# Altium PCB PCB2_OBC_ADCS_asistida.PcbDoc (part 1 of 2)
Units mm, origin at the board's own origin, x right, y up, seen from the top; angles counter-clockwise.
Board outline 90.17 x 95.9 mm, 4 copper layers (Top Layer, GND, PWR, Bottom Layer), stack 1.59 mm thick; 52 components, 110 nets, 475 pads, 111 vias.
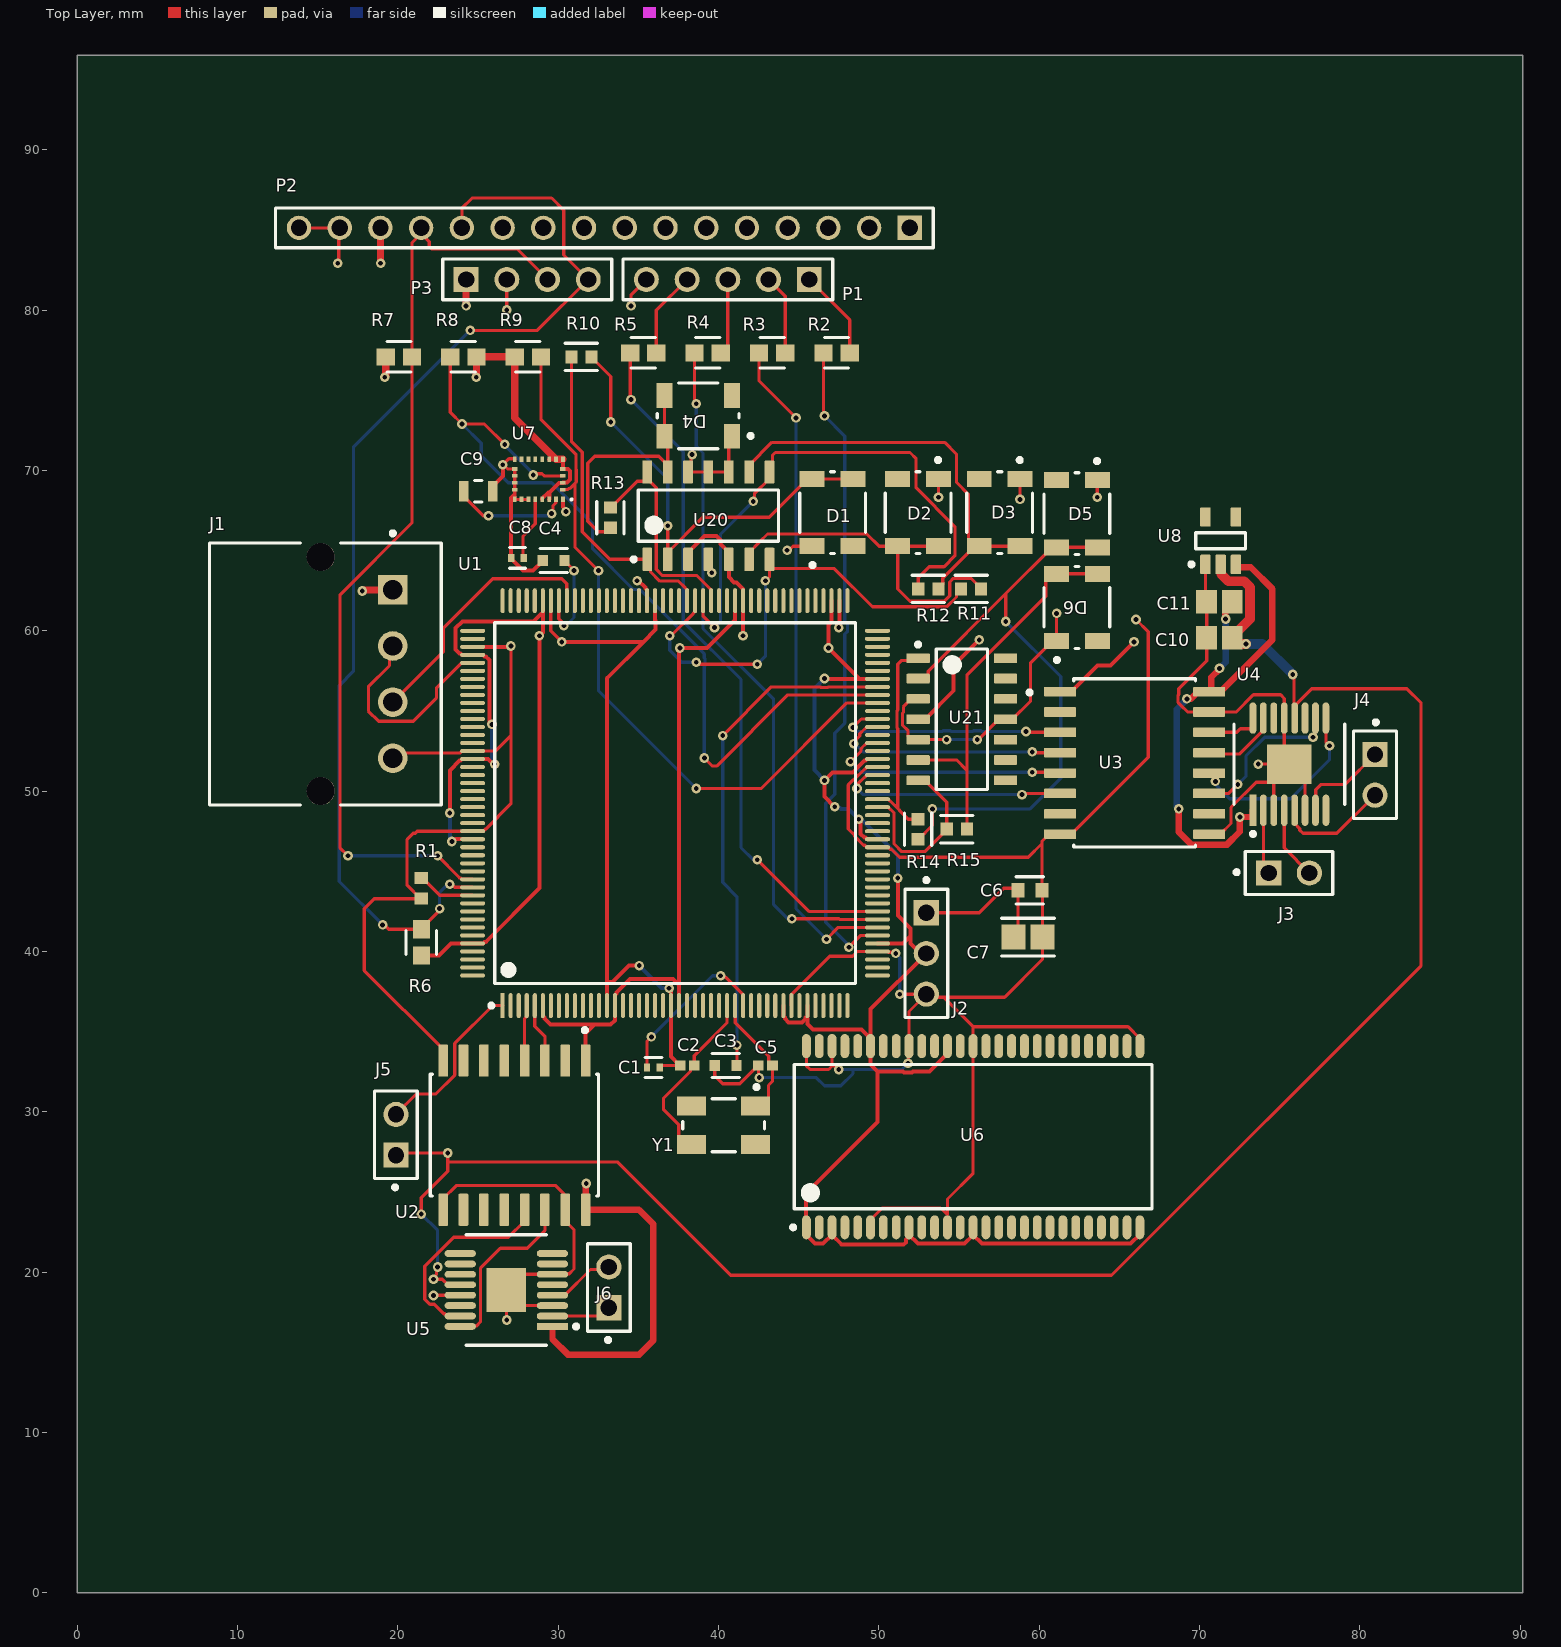
[diagram p0: Top Layer view]
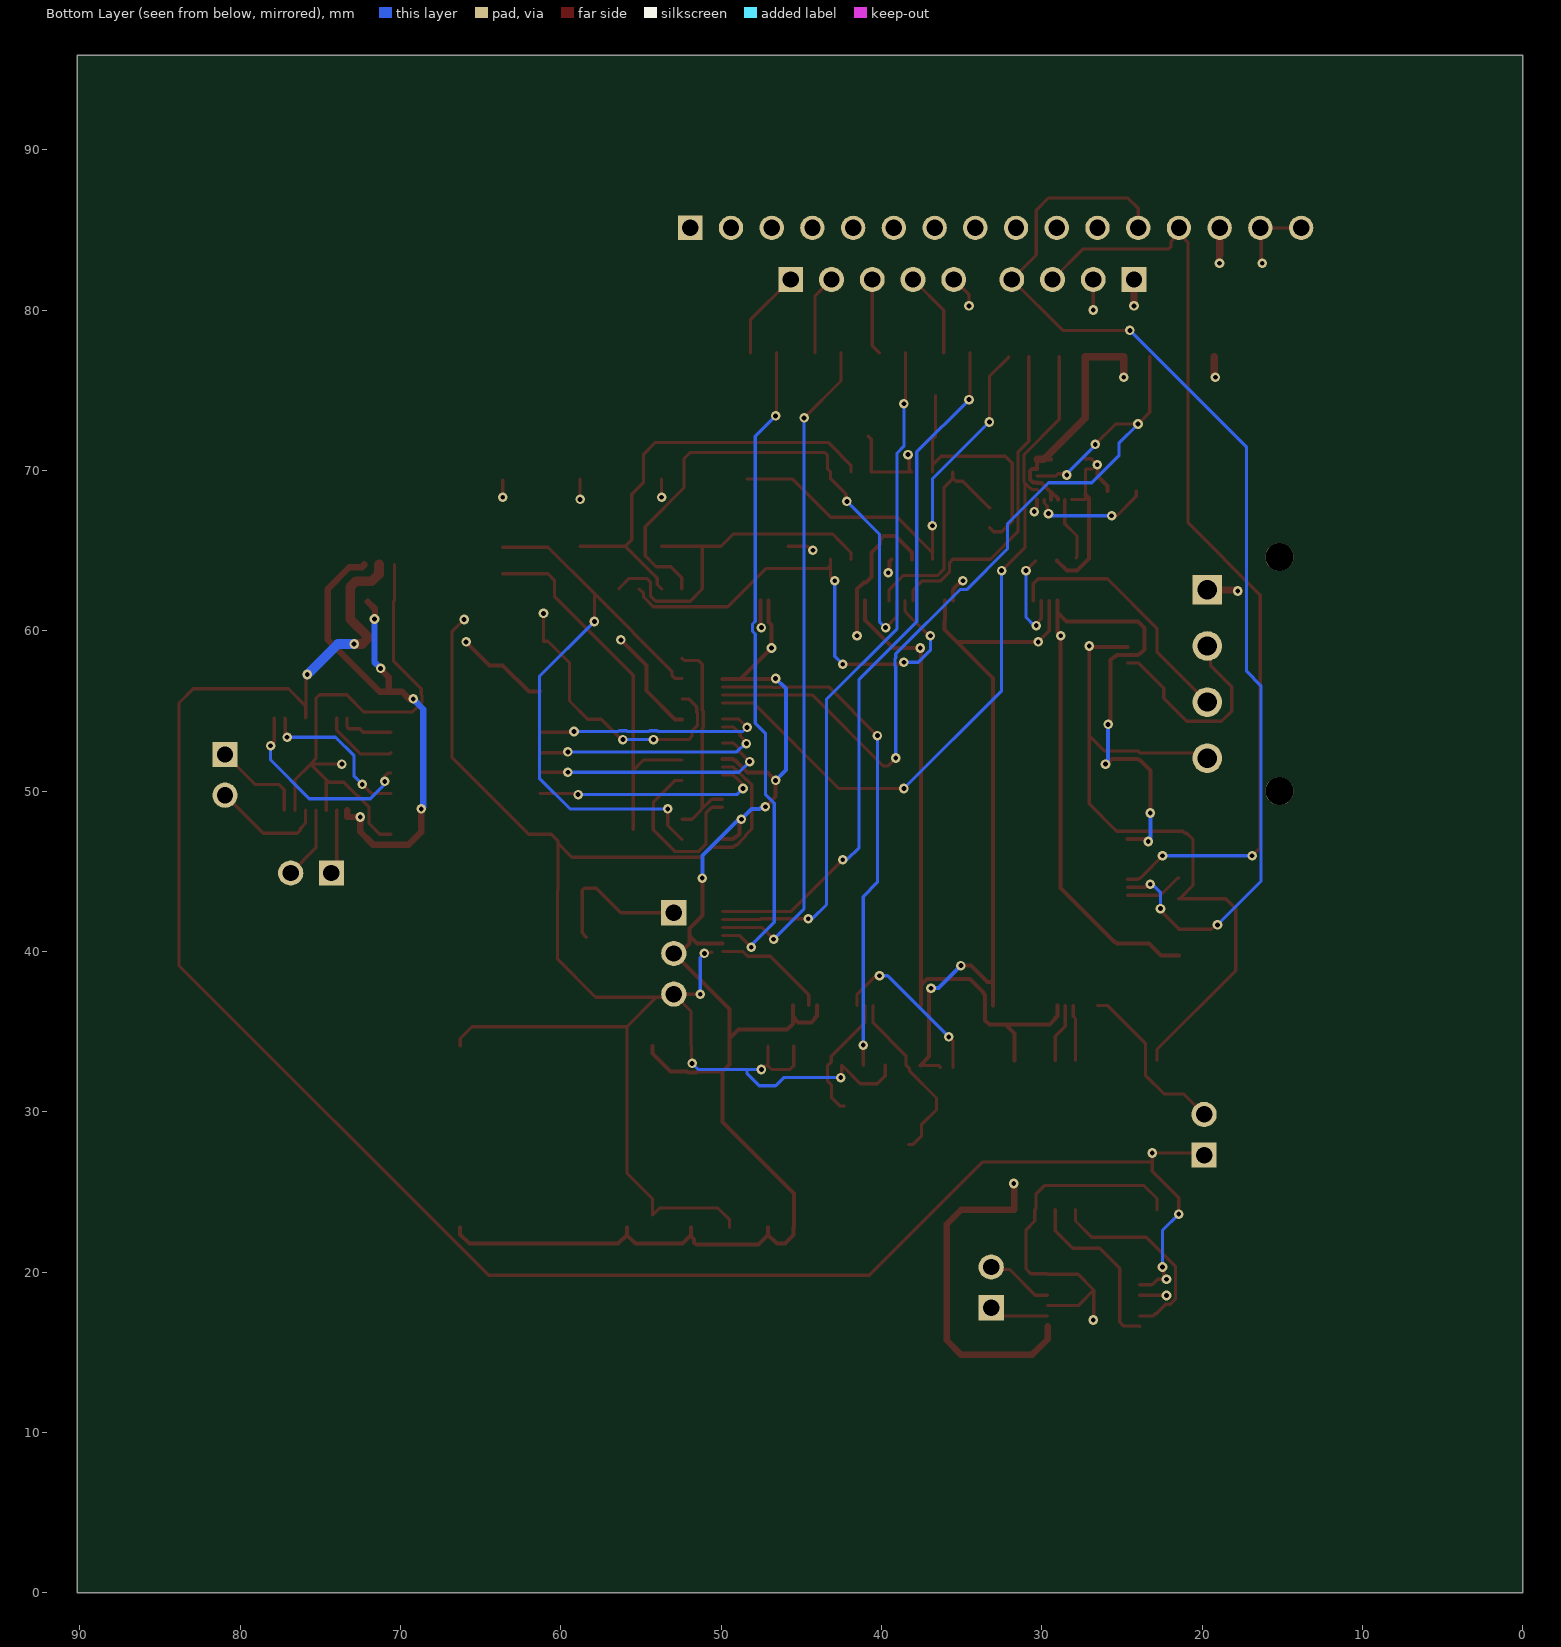
[diagram p1: Bottom Layer view, seen from below]
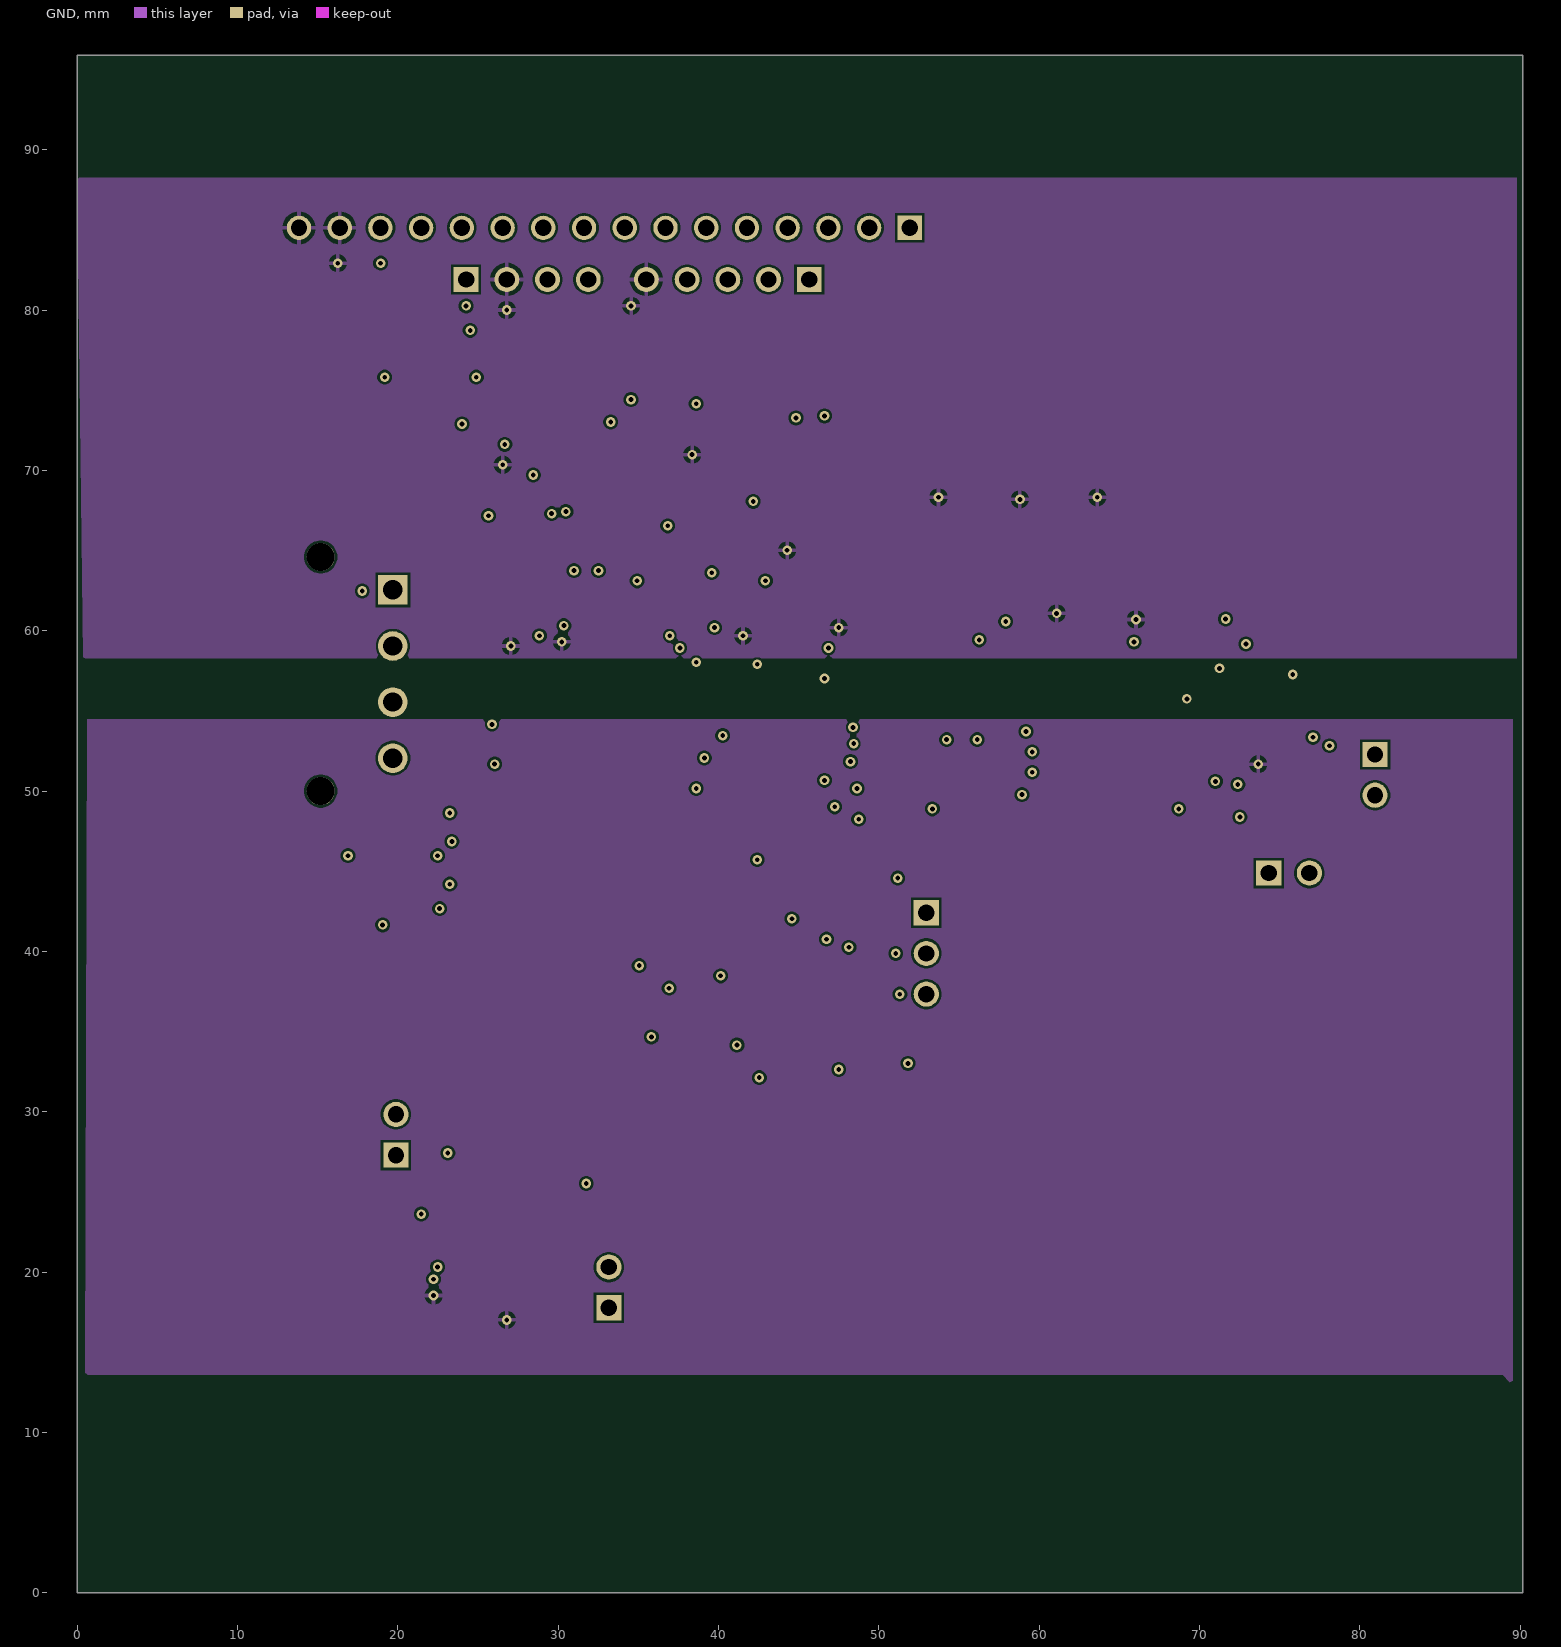
[diagram p2: GND]
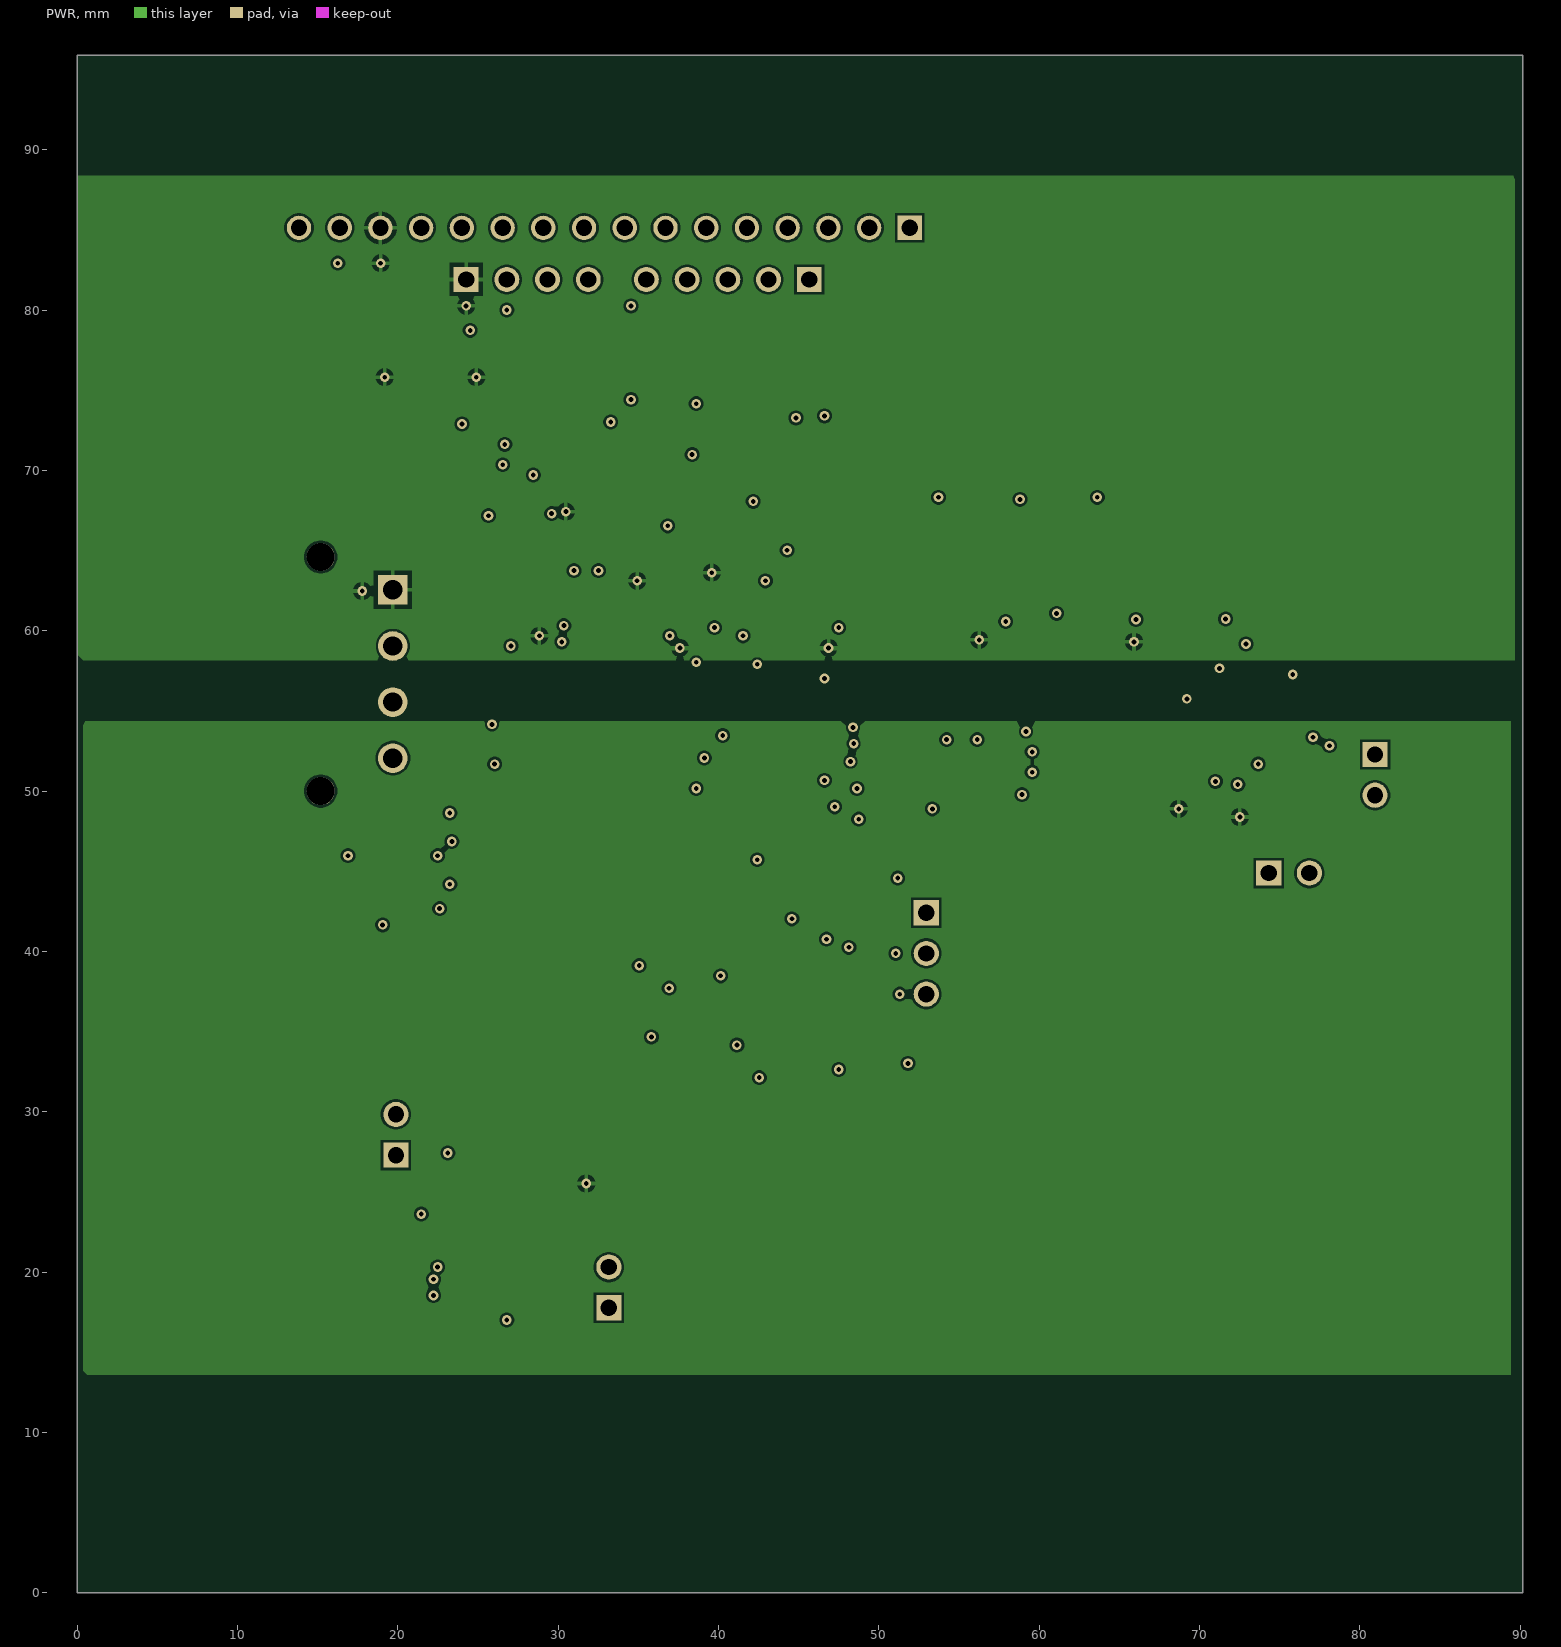
[diagram p3: PWR]
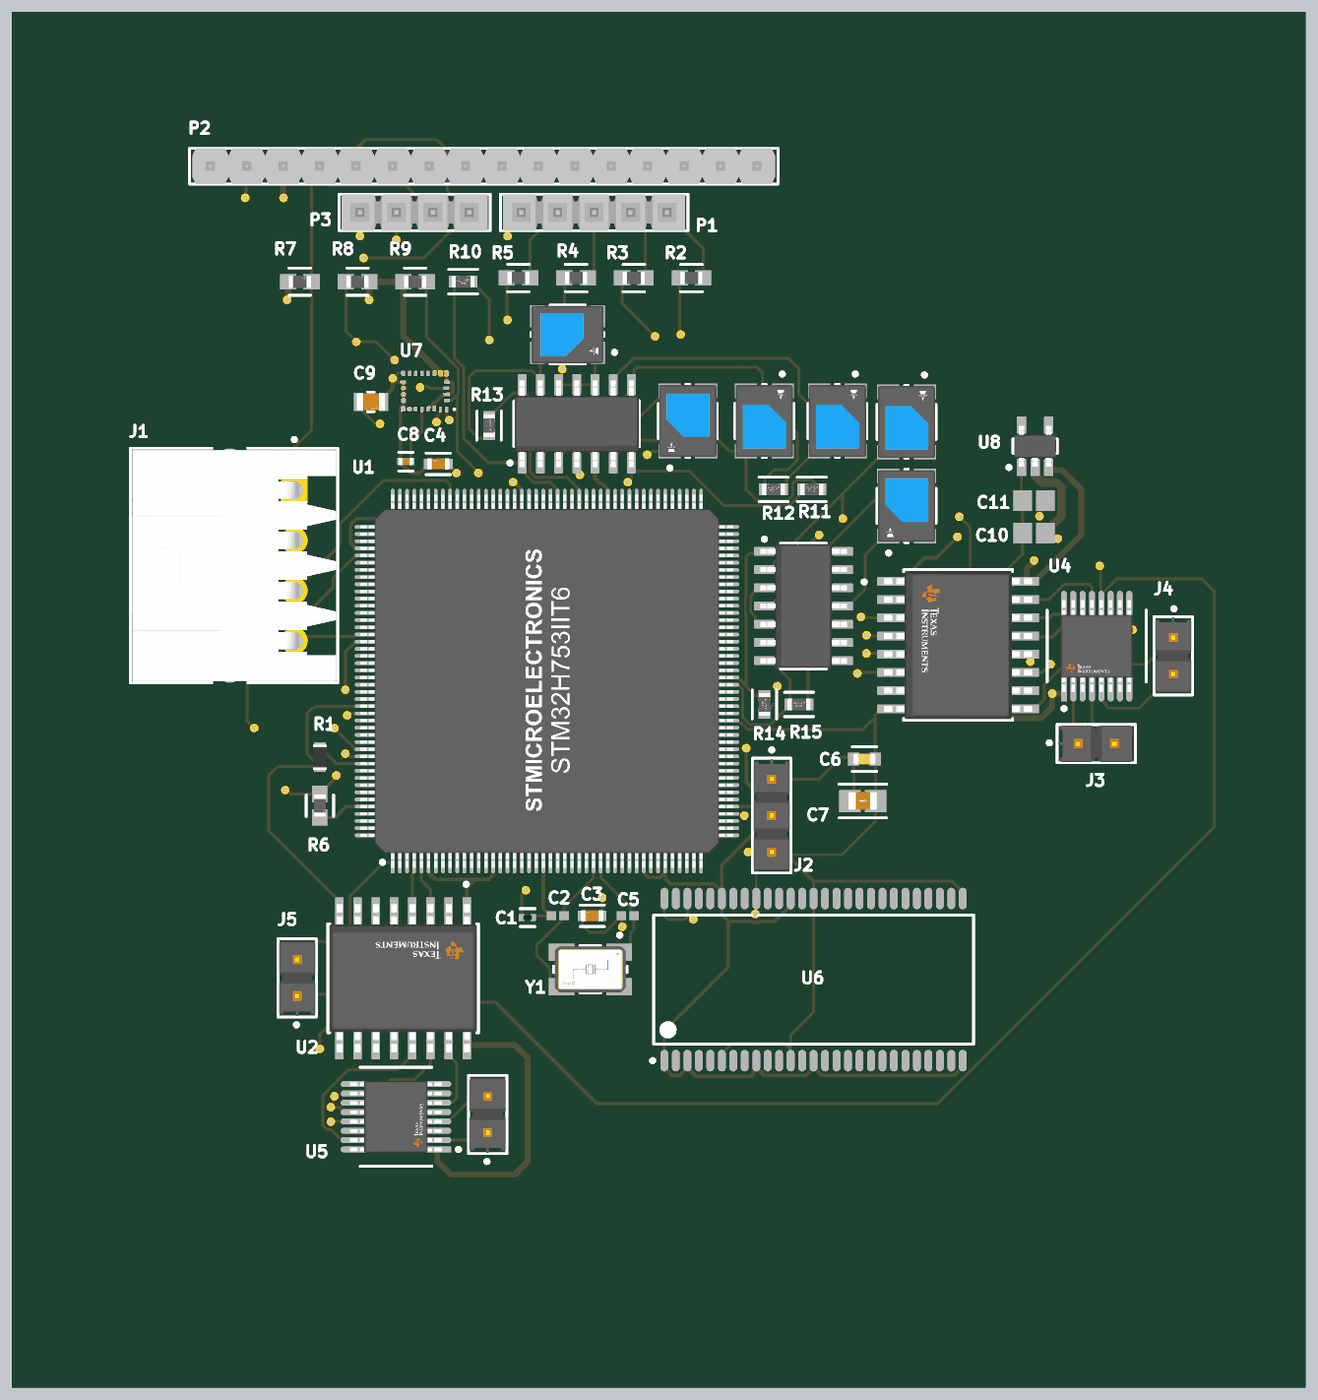
[diagram p5: 3D render of the assembled board from above, using the file's embedded part models]

## Layer stack, top to bottom
Top Solder: solder mask 0.0102, Solder Resist, Dk 3.5
Top Layer: signal copper 0.035
Dielectric 2: prepreg 0.21, PP-006, Dk 4.1
GND: signal copper 0.0175
Dielectric 1: dielectric 1.065, FR-4, Dk 4.8
PWR: signal copper 0.0175
Dielectric 3: prepreg 0.21, PP-006, Dk 4.1
Bottom Layer: signal copper 0.035
Bottom Solder: solder mask 0.0102, Solder Resist, Dk 3.5

## Board outline
0,0 90.17,0 90.17,95.903 0,95.903

## Design rules (kind name [scope] priority, off if disabled: settings)
AssemblyTestPointUsage [All] p1: isadvanced=TRUE
AssemblyTestpoint [All] p1: isadvanced=TRUE testpointundercomponent=TRUE minsize=1.016 maxsize=2.54 preferedsize=1.524 minholesize=0 maxholesize=1.016 preferedholesize=0.813 testpointgrid=0.025 usegrid=TRUE gridtolerance=0 allowsidetop=TRUE allowsidebottom=TRUE
Clearance Clearance_1 [(ExistsOnLayer('GND') Or ExistsOnLayer('PWR')) vs (ExistsOnLayer('GND') Or ExistsOnLayer('PWR'))] p1: gap=0.15 ignorepadtopadclearanceinfootprint=FALSE sourcerule=46 cellrowname=All cellrowtype=0 cellcolname=All cellcoltype=0 innerlayers=TRUE
Clearance Clearance_2 [(ExistsOnLayer('Top Layer') Or ExistsOnLayer('Bottom Layer')) vs (ExistsOnLayer('Top Layer') Or ExistsOnLayer('Bottom Layer'))] p2: gap=0.15 ignorepadtopadclearanceinfootprint=FALSE sourcerule=46 cellrowname=All cellrowtype=0 cellcolname=All cellcoltype=0 outerlayers=TRUE
Clearance [All] p3: gap=0.254 ignorepadtopadclearanceinfootprint=FALSE ismatrix=TRUE
ComponentClearance [All] p1: isadvanced=TRUE gap=0.254 collisioncheckmode=3 verticalgap=0.254 showdistances=FALSE
FabricationTestPointUsage [All] p1: isadvanced=TRUE valid=0 allowmultiple=FALSE
FabricationTestpoint [All] p1: isadvanced=TRUE side=3 testpointundercomponent=TRUE minsize=1.016 maxsize=2.54 preferedsize=1.524 minholesize=0 maxholesize=1.016 preferedholesize=0.813 testpointgrid=0.025 allowsidetop=TRUE allowsidebottom=TRUE usegrid=TRUE gridtolerance=0
FanoutControl Fanout_BGA [IsBGA] p1: isadvanced=TRUE bgadir=Out bgaviamode=Centered fanoutstyle=Auto fanoutdirection=Alternating viagrid=0.025 // Fanout_BGA (Default Rule)
FanoutControl Fanout_LCC [IsLCC] p2: isadvanced=TRUE bgadir=Out bgaviamode=Centered fanoutstyle=Auto fanoutdirection=Alternating viagrid=0.025 // Fanout_LCC (Default Rule)
FanoutControl Fanout_SOIC [IsSOIC] p3: isadvanced=TRUE bgadir=Out bgaviamode=Centered fanoutstyle=Auto fanoutdirection=Alternating viagrid=0.025 // Fanout_SOIC (Default Rule)
FanoutControl Fanout_Small [(CompPinCount < 5)] p4: isadvanced=TRUE bgadir=Out bgaviamode=Centered fanoutstyle=Auto fanoutdirection=OutThenIn viagrid=0.025 // Fanout_Small (Default Rule)
FanoutControl Fanout_Default [All] p5: isadvanced=TRUE bgadir=Out bgaviamode=Centered fanoutstyle=Auto fanoutdirection=Alternating viagrid=0.025 // Fanout_Default (Default Rule)
Height MaxMinHeight_1 [All] p1: isadvanced=TRUE minheight=0 maxheight=25.4 prefheight=12.7
Height [All] p2: isadvanced=TRUE minheight=0 maxheight=25.4 prefheight=12.7
HoleSize [All] p1: isadvanced=TRUE absolutevalues=TRUE maxlimit=2.54 minlimit=0.025 maxpercent=80.000 minpercent=20.000
HoleToHoleClearance [All] p1: isadvanced=TRUE gap=0.254 allowstackedmicrovias=TRUE
LayerPairs [All] p1: isadvanced=TRUE enforce=TRUE
MinimumSolderMaskSliver [All] p1: isadvanced=TRUE minsoldermaskwidth=0.254
NetAntennae [All] p1: isadvanced=TRUE netantennaetolerance=0
PasteMaskExpansion [All] p1: isadvanced=TRUE expansion=0
PlaneClearance [All] p1: isadvanced=TRUE clearance=0.508
PlaneConnect [All] p1: isadvanced=TRUE planeconnectstyle=Relief reliefexpansion=0.508 reliefentries=4 reliefconductorwidth=0.254 reliefairgap=0.254
PolygonConnect [All] p1: connectstyle=Relief reliefconductorwidth=0.254 reliefentries=4 polygonreliefangle="90 Angle" airgapwidth=0.254
RoutingCorners [All] p1: isadvanced=TRUE cornerstyle=45-Degree minsetback=2.54 maxsetback=2.54
RoutingPriority [All] p1: isadvanced=TRUE routingpriority=0
RoutingVias [All] p1: holewidth=0.3 width=0.6 viastyle="Through Hole" minholewidth=0.25 minwidth=0.5 maxholewidth=0.4 maxwidth=0.8
ShortCircuit [All] p1: isadvanced=TRUE allowed=FALSE
SilkToSilkClearance [All] p1: isadvanced=TRUE silktosilkclearance=0.254
SilkToSolderMaskClearance [IsPad] p1: isadvanced=TRUE minsilkscreentomaskgap=0.254 clearancetoexposedcopper=TRUE
SolderMaskExpansion [All] p1: isadvanced=TRUE expansion=0 istentingtop=FALSE
SupplyNets "Schematic Supply Nets_4" [InNet('DGND')] p1: isadvanced=TRUE voltage=0.000
SupplyNets "Schematic Supply Nets_3" [InNet('3V3_ISO')] p2: isadvanced=TRUE voltage=0.000
SupplyNets "Schematic Supply Nets_2" [InNet('PGND')] p3: isadvanced=TRUE voltage=0.000
SupplyNets "Schematic Supply Nets_1" [InNet('V_BATT')] p4: isadvanced=TRUE voltage=0.000
SupplyNets "Schematic Supply Nets" [InNet('3V3_DIGITAL')] p5: isadvanced=TRUE voltage=0.000
UnRoutedNet [All] p1: isadvanced=TRUE
UnpouredPolygon [All] p1: isadvanced=TRUE
Width MaxMinWidth_1 [InNet('3V3_DIGITAL')] p1: maxlimit=0.5 minlimit=0.25 preferedwidth=0.5 minimp=50.000000 maximp=50.000000 favimp=50.000000
Width MaxMinWidth_2 [InNet('3V3_ISO')] p2: maxlimit=0.5 minlimit=0.4 preferedwidth=0.5 minimp=50.000000 maximp=50.000000 favimp=50.000000
Width MaxMinWidth_3 [InNet('V_BATT')] p3: maxlimit=0.7 minlimit=0.2 preferedwidth=0.7 minimp=50.000000 maximp=50.000000 favimp=50.000000
Width MaxMinWidth_4 [InNet('DGND')] p4: maxlimit=0.6 minlimit=0.2 preferedwidth=0.25 minimp=50.000000 maximp=50.000000 favimp=50.000000
Width [All] p5: maxlimit=0.2 minlimit=0.2 preferedwidth=0.2 minimp=50.000000 maximp=50.000000 favimp=50.000000
4 further rules are at their usual default settings.

## Classes and differential pairs
component class U_U_SDRAM: U6
component class U_U_OBC_Core: C1 C2 C3 C4 C5 J1 R1 R2 R3 R4 R5 R6 R7 R8 R9 U1 Y1
component class U_U_Interfaces_Connectors: C6 C7 J2 J3 J4 J5 J6 P1 P2 P3
component class U_U_eMMC: *1
component class U_U_ADCS_SunSensors: D1 D2 D3 D4 D5 D6 R10 R11 R12 R13 R14 R15 U20 U21
component class U_U_ADCS_Isolated: C10 C11 U2 U3 U4 U5 U8
component class U_U_ADCS_IMU: C8 C9 U7

## Components (designator, comment, footprint, x,y, rotation, side; value= is the part's Value field where it differs from the comment)
C1 "GRM155R71C104KA88D" FP-GRM15-MFG 35.941,32.766 r0 top value=0.10μF
C2 "16pF" CAPC1005X55X25NL05T10 38.041,32.893 r0 top
C3 "2.2uF" FP-GRM188-0_1-e0_2_0_5-MFG 40.445,32.894 r180 top
C4 "2.2uF" FP-GRM188-0_1-e0_2_0_5-MFG 29.718,64.389 r180 top
C5 "16pF" CAPC1005X55X25NL05T10 42.926,32.893 r0 top
C6 "0.1uF" FP-CC0603-DA-MFG 59.424,43.815 r0 top value="100 nF"
C7 "10uF" FP-CC0805-0_2-1_45-IPC_A 59.309,40.894 r0 top
C8 "10nF" FP-GRM155-0_05-MFG 27.464,64.55 r180 top
C9 "100nF" FP-GRM21B-0_1-MFG 25.019,68.707 r0 top
C10 "1uF" CAPC2013X140X50NL20T25 71.247,59.563 r180 top
C11 "1uF" CAPC2013X140X50NL20T25 71.247,61.817 r0 top
D1 "VEMD5080X01" FP-6_550-5329_01-4-MFG 47.112,67.378 r180 top
D2 "VEMD5080X01" FP-6_550-5329_01-4-MFG 52.446,67.378 r0 top
D3 "VEMD5080X01" FP-6_550-5329_01-4-MFG 57.536,67.378 r0 top
D4 "VEMD5080X01" FP-6_550-5329_01-4-MFG 38.729,73.412 r270 top
D5 "VEMD5080X01" FP-6_550-5329_01-4-MFG 62.357,67.31 r0 top
D6 "VEMD5080X01" FP-6_550-5329_01-4-MFG 62.357,61.456 r180 top
J1 "53259-0429" FP-53259-0429-MFG 15.485,57.305 r270 top
J2 "J_EPS" FP-TSW-103-22-G-S-MFG 52.959,39.878 r270 top
J3 "J_COIL_X" FP-TSW-102-22-G-S-MFG 75.584,44.892 r0 top
J4 "J_COIL_Y" FP-TSW-102-22-G-S-MFG 80.948,51.016 r270 top
J5 "J_EPS_LCL" FP-TSW-102-22-G-S-MFG 19.879,28.568 r90 top
J6 "J_COIL_Z" FP-TSW-102-22-G-S-MFG 33.161,19.047 r90 top
P1 "J_PAYLOAD" SMTC-TSW-105-05-X-S 45.661,81.915 r180 top
P2 "J_CAMERA" SMTC-MTLW-116-07-X-S-265 51.933,85.134 r180 top
P3 "J_TELEM" SMTC-TSW-104-08-X-S 24.257,81.915 r0 top
R1 "1k" RESC1609X55X30LL15T15 21.463,43.942 r270 top
R2 "33Ω" FP-CRCW0603-e3-IPC_A 47.365,77.343 r180 top
R3 "33Ω" FP-CRCW0603-e3-IPC_A 43.346,77.343 r180 top
R4 "33Ω" FP-CRCW0603-e3-IPC_A 39.326,77.343 r180 top
R5 "33Ω" FP-CRCW0603-e3-IPC_A 35.306,77.343 r180 top
R6 "4.7kΩ" FP-CRCW0603-e3-IPC_A 21.463,40.566 r270 top
R7 "4.7kΩ" FP-CRCW0603-e3-IPC_A 20.066,77.089 r0 top
R8 "4.7kΩ" FP-CRCW0603-e3-IPC_A 24.086,77.089 r0 top
R9 "4.7kΩ" FP-CRCW0603-e3-IPC_A 28.106,77.089 r0 top
R10 "1k" FP-CRGCQ0603-IPC_C 31.449,77.089 r180 top value=1KΩ
R11 "1k" FP-CRGCQ0603-IPC_C 55.752,62.611 r180 top value=1KΩ
R12 "1k" FP-CRGCQ0603-IPC_C 53.086,62.611 r180 top value=1KΩ
R13 "1k" FP-CRGCQ0603-IPC_C 33.256,67.056 r90 top value=1KΩ
R14 "1k" FP-CRGCQ0603-IPC_C 52.451,47.625 r90 top value=1KΩ
R15 "1k" FP-CRGCQ0603-IPC_C 54.864,47.625 r180 top value=1KΩ
U1 "STM32H753IIT6" FP-LQFP176-1T-IPC_B 37.289,49.252 r90 top
U2 "ISO7740DWR" FP-DW0016B-MFG 27.268,28.541 r270 top
U3 "ISO7740DWR" FP-DW0016B-MFG 65.955,51.763 r0 top
U4 "DRV8833PWPR" FP-PWP0016C-IPC_A 75.609,51.685 r90 top
U5 "DRV8833PWPR" FP-PWP0016C-IPC_A 26.769,18.887 r180 top
U6 "MT48LC4M16A2P-6A" MICT-P-54_N 55.88,28.448 r90 top
U7 "LSM9DS1TR" STM-LGA-24_3500X3000X1000 28.79,69.449 r180 top
U8 "TLV70433DBVR" DBV0005A_M 71.321,65.621 r90 top
U20 "OPA4340UA" D0014A_N 39.37,67.183 r90 top
U21 "OPA4340UA" D0014A_N 55.176,54.483 r0 top
Y1 "ABM3B-25.000MHZ-B4U-T" FP-ABM3B-MFG 40.316,29.165 r180 top

## Footprints (in the part's own frame and the unit in brackets; to place one, negate y for a bottom-side part, rotate by r counter-clockwise, add the part's x,y. Pads: shape width x height; smd on the part's side, far side on the other; paste and mask are expansions set on the pad)
CAPC1005X55X25NL05T10 [mm] "Chip Capacitor, 2-Leads, Body 1.00x0.50mm, IPC Medium Density"
  rect 0.66x0.62 smd: 1(-0.44,0) 2(0.44,0)
  body extent -0.53,-0.28 0.53,0.27, height 0.55
CAPC2013X140X50NL20T25 [mm] "Chip Capacitor, 2-Leads, Body 2.00x1.25mm, IPC Medium Density"
  rect 1.3x1.45 smd: 1(-0.8,0) 2(0.8,0)
  body extent -1.1,-0.72 1.1,0.72, height 1.4
D0014A_N [mm] "SOIC, 14-Leads, Body 8.75x4mm, Pitch 1.27mm, IPC Medium Density"
  rrect17% 1.45x0.6 smd: 1(-2.725,3.81) 2(-2.725,2.54) 3(-2.725,1.27) 4(-2.725,0) 5(-2.725,-1.27) 6(-2.725,-2.54) 7(-2.725,-3.81) 8(2.725,-3.81) 9(2.725,-2.54) 10(2.725,-1.27) 11(2.725,0) 12(2.725,1.27) 13(2.725,2.54) 14(2.725,3.81)
  silkscreen extent -2.85,-4.38 1.6,4.78, body extent -3.02,-4.32 3.02,4.32, height 1.59
DBV0005A_M [mm] "SOT23, 5-Leads, Body 3.05x1.75mm, Pitch 0.95mm, IPC Low Density"
  rrect15% 1.2x0.65 smd: 1(-1.475,0.95) 2(-1.475,0) 3(-1.475,-0.95) 4(1.475,-0.95) 5(1.475,0.95)
  silkscreen extent -1.6,-1.55 0.5,1.95, body extent -1.42,-1.46 1.42,1.46, height 1.08
FP-6_550-5329_01-4-MFG [mm]
  rect 1.55x1 smd paste+0 mask+0: 1(1.275,2.1) 2(-1.275,2.1) 3(-1.275,-2.1) 4(1.275,-2.1)
  silkscreen extent -2.05,-2.55 2.05,3.4, body extent -2.15,-2.7 2.15,2.7, height 0.25
FP-53259-0429-MFG [mm]
  rect 1.85x1.85 hole 1.2 paste-2539.97 mask+0: 1(-5.25,4.2)
  round 1.85 hole 1.2 paste-2539.97 mask+0: 2(-1.75,4.2) 3(1.75,4.2) 4(5.25,4.2)
  round 1.75 hole 1.75 unplated paste-2539.97 mask+0: ""(-7.3,-0.3) ""(7.3,-0.3)
  silkscreen extent -8.9,-7.22 8.18,7.22, body extent -8.27,-7.32 8.27,7.32, height 0.25
FP-ABM3B-MFG [mm]
  rect 1.8x1.2 smd paste+0 mask+0: 1(-2,-1.2) 2(2,-1.2) 3(2,1.2) 4(-2,1.2)
  silkscreen extent -2.55,-2.5 2.55,1.65, body extent -3,-1.9 3,1.9, height 0.25
FP-CC0603-DA-MFG [mm]
  rect 0.8x0.9 smd paste+0 mask+0: 1(-0.75,0) 2(0.75,0)
  silkscreen extent -0.85,-0.85 0.85,0.85, body extent -1.35,-0.75 1.35,0.75, height 0.25
FP-CC0805-0_2-1_45-IPC_A [mm]
  rect 1.505x1.556 smd paste+0 mask+0: 1(-0.901,0) 2(0.901,0)
  silkscreen extent -1.65,-1.18 1.65,1.18, body extent -2.15,-1.28 2.15,1.28, height 0.25
FP-CRCW0603-e3-IPC_A [mm]
  rect 1.135x1.062 smd paste+0 mask+0: 1(-0.815,0) 2(0.815,0)
  silkscreen extent -0.75,-0.95 0.75,0.95, body extent -1.88,-1.03 1.88,1.03, height 0.25
FP-CRGCQ0603-IPC_C [mm]
  rect 0.758x0.812 smd paste+0 mask+0: 1(-0.627,0) 2(0.627,0)
  silkscreen extent -1.01,-0.85 1.01,0.85, body extent -1.11,-0.55 1.11,0.55, height 0.25
FP-DW0016B-MFG [mm]
  rrect17% 2x0.6 smd paste+0 mask+0: 1(-4.65,4.445) 2(-4.65,3.175) 3(-4.65,1.905) 4(-4.65,0.635) 5(-4.65,-0.635) 6(-4.65,-1.905) 7(-4.65,-3.175) 8(-4.65,-4.445) 9(4.65,-4.445) 10(4.65,-3.175) 11(4.65,-1.905) 12(4.65,-0.635) 13(4.65,0.635) 14(4.65,1.905) 15(4.65,3.175) 16(4.65,4.445)
  silkscreen extent -6.67,-5.25 3.8,5.25, body extent -5.75,-5.5 5.75,5.5, height 0.25
FP-GRM15-MFG [mm]
  rect 0.4x0.5 smd paste+0 mask+0: 1(-0.4,0) 2(0.4,0)
  silkscreen extent -0.53,-0.63 0.53,0.63, body extent -0.7,-0.38 0.7,0.38, height 0.25
FP-GRM21B-0_1-MFG [mm]
  rect 0.6x1.25 smd paste+0 mask+0: 1(-0.9,0) 2(0.9,0)
  silkscreen extent -0.23,-0.67 0.23,0.67, body extent -1.3,-0.77 1.3,0.77, height 0.25
FP-GRM155-0_05-MFG [mm]
  rect 0.4x0.5 smd paste+0 mask+0: 1(-0.4,0) 2(0.4,0)
  silkscreen extent -0.5,-0.65 0.5,0.65, body extent -0.7,-0.38 0.7,0.38, height 0.25
FP-GRM188-0_1-e0_2_0_5-MFG [mm]
  rect 0.65x0.7 smd paste+0 mask+0: 1(-0.675,0) 2(0.675,0)
  silkscreen extent -0.85,-0.75 0.85,0.75, body extent -1.1,-0.55 1.1,0.55, height 0.25
FP-LQFP176-1T-IPC_B [mm]
  rect 1.559x0.252 smd paste+0 mask+0: 1(-12.627,10.75)
  rrect100% 1.559x0.252 smd paste+0 mask+0: 2(-12.627,10.25) 3(-12.627,9.75) 4(-12.627,9.25) 5(-12.627,8.75) 6(-12.627,8.25) 7(-12.627,7.75) 8(-12.627,7.25) 9(-12.627,6.75) 10(-12.627,6.25) 11(-12.627,5.75) 12(-12.627,5.25) 13(-12.627,4.75) 14(-12.627,4.25) 15(-12.627,3.75) 16(-12.627,3.25) 17(-12.627,2.75) 18(-12.627,2.25) 19(-12.627,1.75) 20(-12.627,1.25) 21(-12.627,0.75) 22(-12.627,0.25) 23(-12.627,-0.25) 24(-12.627,-0.75) 25(-12.627,-1.25) 26(-12.627,-1.75) 27(-12.627,-2.25) 28(-12.627,-2.75) 29(-12.627,-3.25) 30(-12.627,-3.75) 31(-12.627,-4.25) 32(-12.627,-4.75) 33(-12.627,-5.25) 34(-12.627,-5.75) 35(-12.627,-6.25) 36(-12.627,-6.75) 37(-12.627,-7.25) 38(-12.627,-7.75) 39(-12.627,-8.25) 40(-12.627,-8.75) 41(-12.627,-9.25) 42(-12.627,-9.75) 43(-12.627,-10.25) 44(-12.627,-10.75) 89(12.627,-10.75) 90(12.627,-10.25) 91(12.627,-9.75) 92(12.627,-9.25) 93(12.627,-8.75) 94(12.627,-8.25) 95(12.627,-7.75) 96(12.627,-7.25) 97(12.627,-6.75) 98(12.627,-6.25) 99(12.627,-5.75) 100(12.627,-5.25) 101(12.627,-4.75) 102(12.627,-4.25) 103(12.627,-3.75) 104(12.627,-3.25) 105(12.627,-2.75) 106(12.627,-2.25) 107(12.627,-1.75) 108(12.627,-1.25) 109(12.627,-0.75) 110(12.627,-0.25) 111(12.627,0.25) 112(12.627,0.75) 113(12.627,1.25) 114(12.627,1.75) 115(12.627,2.25) 116(12.627,2.75) 117(12.627,3.25) 118(12.627,3.75) 119(12.627,4.25) 120(12.627,4.75) 121(12.627,5.25) 122(12.627,5.75) 123(12.627,6.25) 124(12.627,6.75) 125(12.627,7.25) 126(12.627,7.75) 127(12.627,8.25) 128(12.627,8.75) 129(12.627,9.25) 130(12.627,9.75) 131(12.627,10.25) 132(12.627,10.75)
  rrect100% 0.252x1.559 smd paste+0 mask+0: 45(-10.75,-12.627) 46(-10.25,-12.627) 47(-9.75,-12.627) 48(-9.25,-12.627) 49(-8.75,-12.627) 50(-8.25,-12.627) 51(-7.75,-12.627) 52(-7.25,-12.627) 53(-6.75,-12.627) 54(-6.25,-12.627) 55(-5.75,-12.627) 56(-5.25,-12.627) 57(-4.75,-12.627) 58(-4.25,-12.627) 59(-3.75,-12.627) 60(-3.25,-12.627) 61(-2.75,-12.627) 62(-2.25,-12.627) 63(-1.75,-12.627) 64(-1.25,-12.627) 65(-0.75,-12.627) 66(-0.25,-12.627) 67(0.25,-12.627) 68(0.75,-12.627) 69(1.25,-12.627) 70(1.75,-12.627) 71(2.25,-12.627) 72(2.75,-12.627) 73(3.25,-12.627) 74(3.75,-12.627) 75(4.25,-12.627) 76(4.75,-12.627) 77(5.25,-12.627) 78(5.75,-12.627) 79(6.25,-12.627) 80(6.75,-12.627) 81(7.25,-12.627) 82(7.75,-12.627) 83(8.25,-12.627) 84(8.75,-12.627) 85(9.25,-12.627) 86(9.75,-12.627) 87(10.25,-12.627) 88(10.75,-12.627) 133(10.75,12.627) 134(10.25,12.627) 135(9.75,12.627) 136(9.25,12.627) 137(8.75,12.627) 138(8.25,12.627) 139(7.75,12.627) 140(7.25,12.627) 141(6.75,12.627) 142(6.25,12.627) 143(5.75,12.627) 144(5.25,12.627) 145(4.75,12.627) 146(4.25,12.627) 147(3.75,12.627) 148(3.25,12.627) 149(2.75,12.627) 150(2.25,12.627) 151(1.75,12.627) 152(1.25,12.627) 153(0.75,12.627) 154(0.25,12.627) 155(-0.25,12.627) 156(-0.75,12.627) 157(-1.25,12.627) 158(-1.75,12.627) 159(-2.25,12.627) 160(-2.75,12.627) 161(-3.25,12.627) 162(-3.75,12.627) 163(-4.25,12.627) 164(-4.75,12.627) 165(-5.25,12.627) 166(-5.75,12.627) 167(-6.25,12.627) 168(-6.75,12.627) 169(-7.25,12.627) 170(-7.75,12.627) 171(-8.25,12.627) 172(-8.75,12.627) 173(-9.25,12.627) 174(-9.75,12.627) 175(-10.25,12.627) 176(-10.75,12.627)
  silkscreen extent -12.75,-11.25 11.25,11.58, body extent -13.66,-13.66 13.66,13.66, height 0.25
FP-PWP0016C-IPC_A [mm]
  rect 1.955x0.421 smd paste+0 mask+0: 1(-2.875,2.275)
  rrect100% 1.955x0.421 smd paste+0 mask+0: 2(-2.875,1.625) 3(-2.875,0.975) 4(-2.875,0.325) 5(-2.875,-0.325) 6(-2.875,-0.975) 7(-2.875,-1.625) 8(-2.875,-2.275) 9(2.875,-2.275) 10(2.875,-1.625) 11(2.875,-0.975) 12(2.875,-0.325) 13(2.875,0.325) 14(2.875,0.975) 15(2.875,1.625) 16(2.875,2.275)
  rect 2.46x2.77 smd paste-1000 mask+0: 17(0,0)
  silkscreen extent -4.48,-3.45 2.5,3.45, body extent -4.35,-3 4.35,3, height 0.25
FP-TSW-102-22-G-S-MFG [mm]
  rect 1.57x1.57 hole 1.02 paste-2539.97 mask+0: 1(-1.27,0)
  round 1.57 hole 1.02 paste-2539.97 mask+0: 2(1.27,0)
  silkscreen extent -3.4,-1.34 2.73,1.34, body extent -2.83,-1.44 2.83,1.44, height 0.25
FP-TSW-103-22-G-S-MFG [mm]
  rect 1.57x1.57 hole 1.02 paste-2539.97 mask+0: 1(-2.54,0)
  round 1.57 hole 1.02 paste-2539.97 mask+0: 2(0,0) 3(2.54,0)
  silkscreen extent -4.7,-1.34 4,1.34, body extent -4.1,-1.44 4.1,1.44, height 0.25
MICT-P-54_N [mm] "SOP, 54-Leads, Body 22.22x10.16mm, Pitch 0.8mm, IPC Medium Density"
  oval 1.5x0.55 smd: 1(-5.65,10.4) 2(-5.65,9.6) 3(-5.65,8.8) 4(-5.65,8) 5(-5.65,7.2) 6(-5.65,6.4) 7(-5.65,5.6) 8(-5.65,4.8) 9(-5.65,4) 10(-5.65,3.2) 11(-5.65,2.4) 12(-5.65,1.6) 13(-5.65,0.8) 14(-5.65,0) 15(-5.65,-0.8) 16(-5.65,-1.6) 17(-5.65,-2.4) 18(-5.65,-3.2) 19(-5.65,-4) 20(-5.65,-4.8) 21(-5.65,-5.6) 22(-5.65,-6.4) 23(-5.65,-7.2) 24(-5.65,-8) 25(-5.65,-8.8) 26(-5.65,-9.6) 27(-5.65,-10.4) 28(5.65,-10.4) 29(5.65,-9.6) 30(5.65,-8.8) 31(5.65,-8) 32(5.65,-7.2) 33(5.65,-6.4) 34(5.65,-5.6) 35(5.65,-4.8) 36(5.65,-4) 37(5.65,-3.2) 38(5.65,-2.4) 39(5.65,-1.6) 40(5.65,-0.8) 41(5.65,0) 42(5.65,0.8) 43(5.65,1.6) 44(5.65,2.4) 45(5.65,3.2) 46(5.65,4) 47(5.65,4.8) 48(5.65,5.6) 49(5.65,6.4) 50(5.65,7.2) 51(5.65,8) 52(5.65,8.8) 53(5.65,9.6) 54(5.65,10.4)
  silkscreen extent -5.77,-11.15 4.5,11.35, body extent -5.1,-11.15 5.1,11.15, height 0.05
RESC1609X55X30LL15T15 [mm] "Chip Resistor, 2-Leads, Body 1.75x0.95mm, IPC High Density"
  rect 0.75x0.85 smd: 1(-0.65,0) 2(0.65,0)
  body extent -0.87,-0.48 0.87,0.48, height 0.55
SMTC-MTLW-116-07-X-S-265 [mm] "Terminal Assembly, 1x16 Pins, Vertical, 2.54mm Pitch, Male"
  rect 1.52x1.52 hole 1.02: 1(0,0)
  round 1.52 hole 1.02: 2(2.54,0) 3(5.08,0) 4(7.62,0) 5(10.16,0) 6(12.7,0) 7(15.24,0) 8(17.78,0) 9(20.32,0) 10(22.86,0) 11(25.4,0) 12(27.94,0) 13(30.48,0) 14(33.02,0) 15(35.56,0) 16(38.1,0)
  silkscreen extent -1.46,-1.24 39.56,1.24, body extent -1.27,-1.24 39.37,1.24, height 8.25
SMTC-TSW-104-08-X-S [mm] ".025 SQ Post Terminal Strip Assembly, 1x4 Pins, Vertical, 2.54mm Pitch, Male"
  rect 1.55x1.55 hole 1.02: 1(0,0)
  round 1.55 hole 1.02: 2(2.54,0) 3(5.08,0) 4(7.62,0)
  silkscreen extent -1.46,-1.27 9.08,1.27, body extent -1.27,-1.27 8.89,1.27, height 8.38
SMTC-TSW-105-05-X-S [mm] ".025 SQ Post Terminal Strip Assembly, 1x5 Pins, Vertical, 2.54mm Pitch, Male"
  rect 1.55x1.55 hole 1.02: 1(0,0)
  round 1.55 hole 1.02: 2(2.54,0) 3(5.08,0) 4(7.62,0) 5(10.16,0)
  silkscreen extent -1.46,-1.27 11.62,1.27, body extent -1.27,-1.27 11.43,1.27, height 5.21
STM-LGA-24_3500X3000X1000 [mm] "LGA, 24-Leads, Body 3.65x3.15mm, Pitch 0.43mm"
  rect 0.23x0.35 smd mask+0.05: 1(-1.505,1.25) 6(-1.505,-1.25) 7(-1.075,-1.25) 8(-0.645,-1.25) 9(-0.215,-1.25) 10(0.215,-1.25) 11(0.645,-1.25) 12(1.075,-1.25) 13(1.505,-1.25) 18(1.505,1.25) 19(1.075,1.25) 20(0.645,1.25) 21(0.215,1.25) 22(-0.215,1.25) 23(-0.645,1.25) 24(-1.075,1.25)
  rect 0.35x0.23 smd mask+0.05: 2(-1.505,0.645) 3(-1.505,0.215) 4(-1.505,-0.215) 5(-1.505,-0.645) 14(1.505,-0.645) 15(1.505,-0.215) 16(1.505,0.215) 17(1.505,0.645)
  silkscreen extent -2.11,1.19 -1.98,1.31, body extent -1.82,-1.57 1.83,1.58, height 1.03

## Part data
C1: library part CMP-2100-03641-2, "CAP CER 0.1UF 16V X7R 0402", Capacitance=0.10μF, Manufacturer=Murata, Package=GRM15, Temperature="-55°C to +125°C", Temperature Characteristic=X7R, Temperature Range High=+125°C, Temperature Range Low=-55°C, Tolerance=10%, Voltage Rating=16Vdc, Category=Cap, ComponentLink2Description=Datasheet, ComponentLink2URL=https://search.murata.co.jp/Ceramy/image/img/A01X/G101/ENG/GRM155R71H471KA01-01A.pdf, Device Class L1="Passive Components", Device Class L2=Capacitors, Device Class L3="Ceramic Capacitors", Digikey Description="CAP CER 0.1UF 16V X7R 0402", Height=0.55mm, Ipc Land Pattern Name=CAPC10050X219, Lead Free=yes, Manufacturer Part Number=GRM155R71C104KA88D, Material=Ceramic, Mouser Description="0402 0.1 uF 16V ±10 % Tolerance X7R SMT Multilayer Ceramic Capacitor", Octopart=https://octopart.com/grm155r71c104ka88d-murata-196880, RoHS=TRUE, Standoff Height=0mm
C2 C5: library part CMP-2008-03924-1, Manufacturer=Murata, Part Number=GRM1555C1H160JA01D
C3 C4: library part CMP-2006-02836-2, "Chip Multilayer Ceramic Capacitors for General Purpose, 0603, 2.2uF, X7R, 15%, 10%, 10V", Case Code (Imperial)=0603, Case Code (Metric)=1608, Dielectric=X7R, Max Operating Temperature=125°C, Min Operating Temperature=-55°C, Package Quantity=1, Tolerance=10%, Voltage=10V, Capacitance=2.2uF, Case/Package=0603, Depth=0.8mm, Height=0.8mm, Lead Free="Lead Free", Length=1.6mm, Material=Ceramic, Mount="Surface Mount", Number of Pins=2, Packaging="Cut Tape", REACH SVHC="No SVHC", Termination=SMD/SMT, Thickness=0.035inch, Voltage Rating=10V, Voltage Rating (DC)=10V, Weight=7.1E-05oz, Width=0.031inch
C6: library part CMP-2100-03601-2, "CAP CER 0.1UF 50V X7R 0603", Capacitance="100 nF", Manufacturer=YAGEO, Manufacturer Part Number=CC0603KRX7R9BB104, Package=CC0603-DA, Temperature="-55°C to +125°C", Temperature Characteristic=X7R, Temperature Coefficient=15%, Temperature Range High=+125°C, Temperature Range Low=-55°C, Tolerance=0.1, Voltage="50 V", Automotive=No, Category=Cap, ComponentLink2Description=Datasheet, ComponentLink2URL=http://www.yageo.com/documents/recent/UPY-GPHC_X7R_6.3V-to-50V_18.pdf, Device Class L1="Passive Components", Device Class L2=Capacitors, Device Class L3="Ceramic Capacitors", Digikey Description="CAP CER 0.1UF 50V X7R 0603", Footprint Url=http://www.yageo.com/exep/pages/download/literatures/UPY-C_GEN_24.pdf, Height=0.9mm, Lead Free=Yes, Material=Ceramic, Mouser Description="Multilayer Ceramic Capacitor, CC Series, 0.1 - F, - 10%, X7R, 50 V, 0603 [1608 Metric]", Octopart=https://octopart.com/cc0603krx7r9bb104-yageo-42244635, RoHS=TRUE, Voltage Rating="50 V"
C7: library part CMP-1036-04922-3, "CAP CER 10UF 10V X5R 0805", Case Code (Imperial)=0805, Case Code (Metric)=2012, Dielectric=X5R, Max Operating Temperature=85°C, Min Operating Temperature=-55°C, Package Quantity=1, Resistor Type=Ceramic, Tolerance=10%, Voltage=10V, Capacitance=10uF, Case/Package=0805, Construction=Flat, Depth=1.25mm, Dissipation Factor=15%, Halogen Free="Halogen Free", Height=0.85mm, Lead Free="Lead Free", Length=2mm, Mount="Surface Mount", Number of Pins=2, Packaging="Tape and Reel", Radiation Hardening=No, RoHS Compliant=Yes, Series=CC, Termination=SMD/SMT, Voltage Rating=10V, Voltage Rating (DC)=10V, Width=0.049inch
C8: library part CMP-06035-007234-1, "Chip Multilayer Ceramic Capacitors for General Purpose, 0402, 10000pF, X7R, 15%, 5%, 50V", Dielectric=X7R, Package Quantity=50000, Tolerance=5%, Voltage Rating (DC)=50V, Capacitance=10nF, Length=1mm, Packaging="Tape and Reel", Thickness=500um, Weight=0.000212oz, Width=500um
C9: library part CMP-06035-043106-1, "Chip Multilayer Ceramic Capacitors for General Purpose, 0805, 0.10uF, U2J, -750ppm/°C, 5%, 10V", Case/Package=0805, Dielectric=U2J, Tolerance=5%, Voltage Rating (DC)=10V, Capacitance=100nF, Length=2mm, Thickness=1.25mm, Width=1.25mm
C10 C11: library part CMP-2007-04663-1, Manufacturer="AVX Interconnect / Elco", Part Number=0805YD105MAT2A
D1 D2 D3 D4 D5 D6: library part CMP-02531-000007-1, "PHOTODIODE 750 TO 1050 NM", Case/Package=SMD/SMT, Max Operating Temperature=110°C, Max Reverse Voltage (DC)=20V, Min Operating Temperature=-40°C, Diode Type=PIN, Mount="Surface Mount", Packaging="Tape and Reel", Response Time=70ns, RoHS Compliant=Yes, Viewing Angle=65°, Wavelength=950nm
J1: library part CMP-00257-07647115-1, "53259-0429 Mighty-SPOX Header, 3.50mm Pitch, Right-Angle, 4 Circuits, Brass (CuZn) Contact", Current Rating=5.5A, Manufacturer Lifecycle Status=ACTIVE, Voltage Rating=250V, Contact Material=Brass, Contact Plating=Tin, Country of Origin=KR, Glow Wire Compliant=Non-compliant, Lifecycle Status=Production, NexarPartId=7647115, Number of Circuits=4, Number of Positions=4, Number of Rows=1, Orientation="Right Angle", Pitch=3.5mm, Plating=Tin, RoHS=Compliant, Termination="Through Hole"
J2: library part CMP-02766-000544-1, "Conn Unshrouded Header HDR 3 POS 2.54mm Solder ST Thru-Hole Bulk", Housing Color=Black, Max Current Rating=7.6A, Max Operating Temperature=125°C, Max Voltage Rating (AC)=550V, Min Operating Temperature=-55°C, Contact Material=Bronze, Contact Plating=Gold, Depth=2.54mm, Gender=Male, Housing Material=Polyester, Length=7.62mm, Number of Contacts=3, Number of Rows=1, Orientation=Straight, Packaging=Bulk, Pitch=2.54mm, REACH SVHC="No SVHC", Termination=Solder
J3 J4 J5 J6: library part CMP-02766-000117-1, "CONN HEADER VERT 2POS 2.54MM", Housing Color=Black, Max Current Rating=7.6A, Max Operating Temperature=125°C, Max Voltage Rating (AC)=550V, Min Operating Temperature=-55°C, Contact Material=Bronze, Contact Plating=Gold, Depth=2.54mm, Gender=Male, Housing Material=Polyester, Length=5.08mm, Number of Contacts=2, Number of Rows=1, Orientation=Straight, Packaging=Bulk, Pitch=2.54mm, Radiation Hardening=No, REACH SVHC="No SVHC", Termination=Solder
P1: library part CMP-1024-00366-1, "0.025\" SQ Post Header, Through-hole, Vertical, -55 to 125 degC, 2.54 mm Pitch, 5-Pin, Male, RoHS", Manufacturer=Samtec, PartNumber=TSW-105-05-L-S, Temperature Range="-55 to 125 degC", ComponentLink1Description="Manufacturer URL", ComponentLink1URL=http://www.samtec.com, ComponentLink2Description=Datasheet, ComponentLink2URL=http://www.samtec.com/documents/webfiles/pdf/TSW_TH.PDF, ComponentLink3Description="Package Specification", ComponentLink3URL=http://www.samtec.com/documents/webfiles/cpdf/TSW-XXX-XX-XXX-X-XX-XXX-MKT.pdf, DatasheetVersion=F-214, Mounting Technology=Through-hole, Orientation=Vertical, PackageDescription=".025[0.64] SQ. Post Terminal Strip Assembly", PackageReference=TSW-105-05-X-S, PackageVersion="DM, 8/1988", Pitch="2.54 mm", RoHS=True
P2: library part CMP-1024-00092-1, "Low Profile .025\" SQ Post Header, Through-hole, Vertical, -55 to 125 degC, 2.54 mm Pitch, 16-Pin, Male, RoHS", Manufacturer=Samtec, PartNumber=MTLW-116-07-G-S-265, Temperature Range="-55 to 125 degC", ComponentLink1Description="Manufacturer URL", ComponentLink1URL=http://www.samtec.com, ComponentLink2Description=Datasheet, ComponentLink2URL=http://www.samtec.com/documents/webfiles/pdf/MTLW_TH.PDF, ComponentLink3Description="Package Specification", ComponentLink3URL=http://www.samtec.com/documents/webfiles/cpdf/MTLW-1XX-XX-XX-X-XXX-XX-XX-MKT1.pdf, DatasheetVersion=F-214, Mounting Technology=Through-hole, Orientation=Vertical, PackageDescription="Low Profile Terminal Assembly", PackageReference=MTLW-116-07-X-S-265, PackageVersion="T, 6/1991", Pitch="2.54 mm", RoHS=True
P3: library part CMP-1024-00358-1, "0.025\" SQ Post Header, Through-hole, Vertical, -55 to 125 degC, 2.54 mm Pitch, 4-Pin, Male, RoHS", Manufacturer=Samtec, PartNumber=TSW-104-08-L-S, Temperature Range="-55 to 125 degC", ComponentLink1Description="Manufacturer URL", ComponentLink1URL=http://www.samtec.com, ComponentLink2Description=Datasheet, ComponentLink2URL=http://www.samtec.com/documents/webfiles/pdf/TSW_TH.PDF, ComponentLink3Description="Package Specification", ComponentLink3URL=http://www.samtec.com/documents/webfiles/cpdf/TSW-XXX-XX-XXX-X-XX-XXX-MKT.pdf, DatasheetVersion=F-214, Mounting Technology=Through-hole, Orientation=Vertical, PackageDescription=".025[0.64] SQ. Post Terminal Strip Assembly", PackageReference=TSW-104-08-X-S, PackageVersion="DM, 8/1988", Pitch="2.54 mm", RoHS=True
R1: library part CMP-1012-00623-3, "Chip Resistor, 10 KOhm, +/- 1%, 0.1 W, -55 to 155 degC, 0603 (1608 Metric), RoHS, Tape and Reel", Case Code (Imperial)=0603, Case Code (Metric)=1608, Manufacturer=Panasonic, Max Operating Temperature=155degC, Max Power Dissipation=100mW, Min Operating Temperature=-55degC, Package Description="2-Pin Surface Mount Device, Body 1.6 x 0.85 mm", Package Quantity=1, Package Reference=603, Resistance=10KOhm, Temperature Coefficient=100ppm\/degreesC, Tolerance=1%, Voltage Rating=75V, Case\/Package=0603, Composition=ThickFilm, Contact Plating=Tin, Datasheet URL=https://industrial.panasonic.com/cdbs/www-data/pdf/RDA0000/AOA0000C304.pdf, Datasheet Version=02/2017, Depth=0.8mm, Height=0.45mm, Lead Free=LeadFree, Length=1.6mm, Manufacturer URL=http://www.panasonic.com/, Military Standard=Not, Mount=SurfaceMount, Mounting Technology=SurfaceMount, Number of Pins=2, Number of Terminations=2, Packaging=TapeandReel, Power Rating=100mW, Radiation Hardening=No, REACH SVHC=NoSVHC, RoHSCompliant=true, Termination=SMD/SMT, Voltage Rating (DC)=75V, Width=0.031inch
R2 R3 R4 R5: library part CMP-2000-03250-2, "RES Thick Film, 33Ω, 1%, 0.1W, 100ppm/°C, 0603", Case Code (Imperial)=0603, Case Code (Metric)=1608, Max Operating Temperature=155°C, Max Power Dissipation=100mW, Min Operating Temperature=-55°C, Package Quantity=10, Resistance=33R, Temperature Coefficient=100ppm/°C, Tolerance=1%, Voltage Rating=75V, Case/Package=0603, Composition="Thick Film", Contact Plating=Tin, Depth=0.85mm, Features="Automotive AEC-Q200", Height=0.45mm, Lead Free="Lead Free", Length=1.55mm, Military Standard=Not, Mount="Surface Mount", Number of Terminations=2, Packaging="Tape and Reel", Power Rating=100mW, Radiation Hardening=No, Termination=SMD/SMT, Voltage Rating (DC)=75V, Weight=7.1E-05oz, Width=0.85mm
R6 R7 R8 R9: library part CMP-1666-00019-3, "RES Thick Film, 4.7kΩ, 1%, 0.1W, 100ppm/°C, 0603", Case Code (Imperial)=0603, Case Code (Metric)=1608, Max Operating Temperature=155°C, Min Operating Temperature=-55°C, Package Quantity=5000, Power Rating=100mW, Resistance=4.7kR, Temperature Coefficient=100ppm/°C, Tolerance=1%, Voltage Rating=75V, Case/Package=0603, Composition="Thick Film", Contact Plating=Tin, Depth=0.85mm, Height=0.45mm, Lead Free="Lead Free", Length=1.55mm, Military Standard=Not, Mount="Surface Mount", Packaging="Tape and Reel", Termination=SMD/SMT, Voltage Rating (DC)=75V, Weight=7.1E-05oz, Width=0.85mm
R10 R11 R12 R13 R14 R15: library part CMP-03211-008566-1, "CRGCQ0603 1KΩ 1% ±100ppm/°C 75V", Ambient Temperature Range High=+70°C, Manufacturer="TE Connectivity", Manufacturer Part Number=CRGCQ0603F1K0, Package=CRGCQ0603, Power Rating=0.1W, Resistance=1KΩ, Temperature="-55°C to +155°C", Temperature Coefficient=±100ppm/°C, Temperature Range High=+155°C, Temperature Range Low=-55°C, Tolerance=0.01, Voltage Rating=75V, Category=Res, ComponentLink2Description=Datasheet, ComponentLink2URL=https://www.te.com/commerce/DocumentDelivery/DDEController?Action=showdoc&DocId=Data+Sheet%7F1773204-3%7F1%7Fpdf%7FEnglish%7FENG_DS_1773204-3_1.pdf%7F4-2176339-694, Composition="Thick Film", Device Class L1="Passive Components", Device Class L2=Resistors, Device Class L3="Chip SMD Resistors", Height=0.55mm, Ipc Land Pattern Name=RESC16080X45, Lead Free=Yes, Octopart=https://octopart.com/crgcq0603f1k0-te+connectivity-91018050, RoHS=TRUE, Series=CRGCQ
U1: "LQFP 176 24X24X1.4", Ambient Temperature Range High=+85°C, Ambient Temperature Range Low=-40°C, Frequency=400MHz, Manufacturer=STMicroelectronics, Max Junction Temp=+125°C, Max Supply Voltage=3.6V, Min Supply Voltage=1.62V, Nominal Supply Current=10-165mA, Package=LQFP176-1T, Temperature="-40°C to +85°C", Automotive=No, Category=IC, ComponentLink2Description=Datasheet, ComponentLink2URL=https://www.st.com/resource/en/datasheet/stm32h753ii.pdf, Core Architecture="Arm Cortex-M7", Data Bus Width=32bits, Device Class L1="Integrated Circuits (ICs)", Device Class L2="Embedded Processors and Controllers", Device Class L3="DSPs - Digital Signal Processors", Digikey Description="LQFP 176 24X24X1.4", Height=1.6mm, Interface=I2C,SPI,UART,USART,CAN,USB,LIN,IrDA,Ethernet,I2S,SMBus,Other, Ipc Land Pattern Name=QFP50P2600X2600X160-176, Lead Free=Yes, Manufacturer Part Number=STM32H753IIT6, Memory Size=2MBytes, Memory Type=FLASH, Number Of A/D Converters=3, Number Of Adc Channels=36, Number Of Cores=1, Number Of Ethernet Channels=1, Number Of I2C Channels=4, Number Of I/Os=140, Number Of Pwm Channels=8, Number Of Spi Channels=6, Number Of Timers/Counters=20, Number Of Uart Channels=9, Number Of Usb Channels=2, Octopart=https://octopart.com/stm32h753iit6-stmicroelectronics-87680940, Ram Size=1MBytes, RoHS=TRUE, Standoff Height=0.05mm, Temperature Range High=+85°C, Temperature Range Low=-40°C
U2 U3: library part CMP-04872-000013-1, "DGTL ISO 5KV 4CH GEN PURP 16SOIC", Ambient Temperature Range High=+125°C, Ambient Temperature Range Low=-55°C, Manufacturer="Texas Instruments", Manufacturer Part Number=ISO7741DWR, Max Junction Temp=+150°C, Max Supply Voltage=5.5V, Min Supply Voltage=2.25V, Nominal Supply Current=1.5-18mA, Package=DW0016B, Temperature="-55°C to +125°C", Automotive=No, Category=IC, ComponentLink2Description=Datasheet, ComponentLink2URL=http://www.ti.com/lit/ds/symlink/iso7741.pdf, Device Class L1="Integrated Circuits (ICs)", Device Class L2="Interface ICs", Device Class L3=unset, Digikey Description="DGTL ISO 5KV 4CH GEN PURP 16SOIC", Height=2.65mm, Ipc Land Pattern Name=SOIC127P1030X265-16, Lead Free=Yes, Mouser Description="High-speed, low-power, robust EMC quad-channel digital isolator 16-SOIC -55 to 125", Octopart=https://octopart.com/iso7741dwr-texas+instruments-71651905, RoHS=TRUE, Standoff Height=0.1mm, Temperature Range High=+125°C, Temperature Range Low=-55°C
U4 U5: library part CMP-1529-00004-3, "IC MOTOR DRIVER PAR 16HTSSOP", Case/Package=HTSSOP, Max Operating Temperature=85°C, Max Output Current=2A, Max Supply Voltage=10.8V, Min Operating Temperature=-40°C, Min Supply Voltage=2.7V, Nominal Supply Current=3mA, Output Current=1.5A, Package Quantity=2000, Fault Protection="Over Temperature", Interface=PWM, Lead Free="Lead Free", Number of Outputs=2, Number of Pins=16, Output Current per Channel=1.5A, Packaging="Tape and Reel", Radiation Hardening=No, REACH SVHC="No SVHC", RMS Current (Irms)=1.5A, RoHS Compliant=Yes, Series=DRV8833, Supply Current=3mA, Technology=NMOS
U6: library part MT48LC4M16A2P, "64Mb PC133 SDR SDRAM, 4Mb x 16, 6ns, 3.3V, 0C to 70 degC, 54-Pin TSOP, Pb-Free", Manufacturer=Micron, Op. Temp.="0C to +70CÂ", Voltage=3.3VÂ, CL="CL = 3Â", Clock Rate="166 MHzÂ", ComponentLink1Description="Manufacturer URL", ComponentLink1URL=http://www.micron.com/, ComponentLink2Description=Datasheet, ComponentLink2URL=http://www.micron.com/~/media/Documents/Products/Data%20Sheet/DRAM/128Mbx16x32Mobile.pdf, ComponentLink3Description="Package Specification", ComponentLink3URL=http://www.micron.com/~/media/Documents/Products/Data%20Sheet/DRAM/128mb_x4x8x16_sdram.pdf, Cycle Time=6nsÂ, Data Rate=PC133Â, DatasheetVersion=Rev.Q, Density=64MbÂ, Depth=4MbÂ, Mounting Technology="Surface Mount", PackageDescription="54-Pin Thin Small Outline Package, 10.16 x 22.22 mm, Pitch 0.8 mm", PackageReference=MICT-P-54, PackageVersion=Rev.Q, PartNumber=MT48LC4M16A2P-6A, RoHS=YesÂ, Width=x16Â
U7: library part CMP-2000-06606-1, "iNEMO Inertial Module: 3D Accelerometer, 3D Gyroscope, 3D Magnetometer, 1.9 to 3.6 V, -40 to 85 degC, 24-Pin LGA, RoHS, Tape and Reel", Manufacturer=STMicroelectronics, Package Description="24-Pin Plastic Land Grid Array Package, Body 3.65 x 3.15 mm, Pitch 0.43 mm", Package Reference=LGA-24_3500X3000X1000, PartNumber=LSM9DS1, Sensor Case Style=LGA, Supply Voltage Max=3.6V, Supply Voltage Min=1.9V, Acceleration Range=±2g,±4g,±8g,±16g, Datasheet URL=http://www2.st.com/content/ccc/resource/technical/document/datasheet/1e/3f/2a/d6/25/eb/48/46/DM00103319.pdf/files/DM00103319.pdf/jcr:content/translations/en.DM00103319.pdf, Datasheet Version="Rev. 3, 03/2015", Gyroscope Range=±245°/s,±500°/s,±2000°/s, Manufacturer URL=http://www.st.com/, MEMS Module Function=Tri-AxisGyroscope,Tri-AxisAccelerometer,Tri-AxisMagnetometer, Mounting Technology=SurfaceMount, MSL=MSL3-168hours, No. of Pins=24Pins, Packaging=CutTape, Product Range=-, SVHC=NoSVHC(17-Dec-2015)
U8: library part CMP-0394-00651-2, "Single Output LDO, 150 mA, Fixed 3.3 V Output, 2.5 to 24 V Input, with Ultra-Low IQ, 5-pin SOT-23 (DBV), -40 to 125 degC, Green (RoHS & no Sb/Br)", Manufacturer="Texas Instruments", Accuracy(%)=2, Code_JEDEC=MO-178, ComponentLink1Description="Manufacturer URL", ComponentLink1URL=http://www.ti.com/, ComponentLink2Description=Datasheet, ComponentLink2URL=http://www.ti.com/general/docs/lit/getliterature.tsp?genericPartNumber=TLV70433&fileType=pdf, ComponentLink3Description="Package Specification", ComponentLink3URL=http://www.ti.com/litv/pdf/mpds018i, DatasheetVersion=SBVS148C, Eco-Plan="Green (RoHS & no Sb/Br)", Fixed Output Options(V)=3.3, Iout(Max)(A)=0.15, Iq(Typ)(mA)=0.003, Mounting Technology="Surface Mount", PackageDescription="5-Pin Plastic Small Outline, Body 1.60 Ãƒâ€” 2.90 mm, Pitch 0.95 mm", PackageReference=DBV0005A, PackageVersion=4073253-4/K, PartNumber=TLV70433DBVR, SubFamily="Single Channel LDO", Vdo(Typ)(mV)=400, Vin(Max)(V)=24, Vin(Min)(V)=2.5, Vout Adj(Max)(V)=3.3, Vout Adj(Min)(V)=3.3
U20 U21: library part CMP-0272-00100-3, "Single-Supply, Rail-to-Rail Operational Amplifier MicroAmplifier(TM) Series, 2.7 to 5 V, -40 to 85 degC, 14-pin SOIC (D14), Green (RoHS & no Sb/Br)", Manufacturer="Texas Instruments", Total Supply Voltage(Max)(+5V is 5, +/-5V is 10)=5, Total Supply Voltage(Min)(+5V is 5, +/-5V is 10)=2.7, CMRR(Min)(dB)=80, Code_JEDEC=MS-012, ComponentLink1Description="Manufacturer URL", ComponentLink1URL=http://www.ti.com/, ComponentLink2Description=Datasheet, ComponentLink2URL=http://www.ti.com/general/docs/lit/getliterature.tsp?genericPartNumber=OPA4340&fileType=pdf, ComponentLink3Description="Package Specification", ComponentLink3URL=http://www.ti.com/lit/ml/mpds177g/mpds177g.pdf, DatasheetVersion=SBOS073B, Eco-Plan="Green (RoHS & no Sb/Br)", IIB(Max)(pA)=10, Iq per channel(Max)(mA)=0.95, Mounting Technology="Surface Mount", Number of Channels=4, Offset Drift(Typ)(uV/C)=2.5, PackageDescription="14-Pin Plastic Small Outline, Body 8.65 x 3.9 mm, Pitch 1.27 mm", PackageReference=D0014A, PackageVersion="4040047-5/M, 06/2011", PartNumber=OPA4340UA, Slew Rate(Typ)(V/us)=6, Sub Family="Low Input Bias Current Amp (<=10pA), Low Offset Voltage Amplifier (<=500uV), Low Supply Voltage Amplifier (<=2.7V), Precision Amplifier", Vio (25C)(Max)(mV)=0.5, Vn at 1kHz(Typ)(nV/rtHz)=25
Y1: library part CMP-27762-011355-1, "Crystal 25MHz ±30ppm 18pF SMD-4 5mm x 3.2mm", Capacitance=1.8E-11F, Case/Package=SMD/SMT, ESR (Equivalent Series Resistance)=50R, Frequency=25MHz, Frequency Stability=10ppm, Frequency Tolerance=30ppm, Load Capacitance=18pF, Max Operating Temperature=70°C, Min Operating Temperature=-20°C, Height=0.043inch, Lead Free="Lead Free", Length=0.197inch, Mount="Surface Mount", Packaging="Tape and Reel", Width=0.126inch

## Via types
v1: diameter 0.6, hole 0.3, Top Layer to Bottom Layer, 111 vias